# Altium PCB OmniCore_SDR.PcbDoc (part 14 of 14)
Units mil, origin at the board's own origin, x right, y up, seen from the top; angles counter-clockwise.
Board outline 4724.72 x 2755.91 mil, 8 copper layers (Top, GND 1, Layer 1, Layer 2, GND 2, Layer 3, Power, Bottom), stack 40.468 mil thick; 534 components, 427 nets, 2325 pads, 1892 vias.
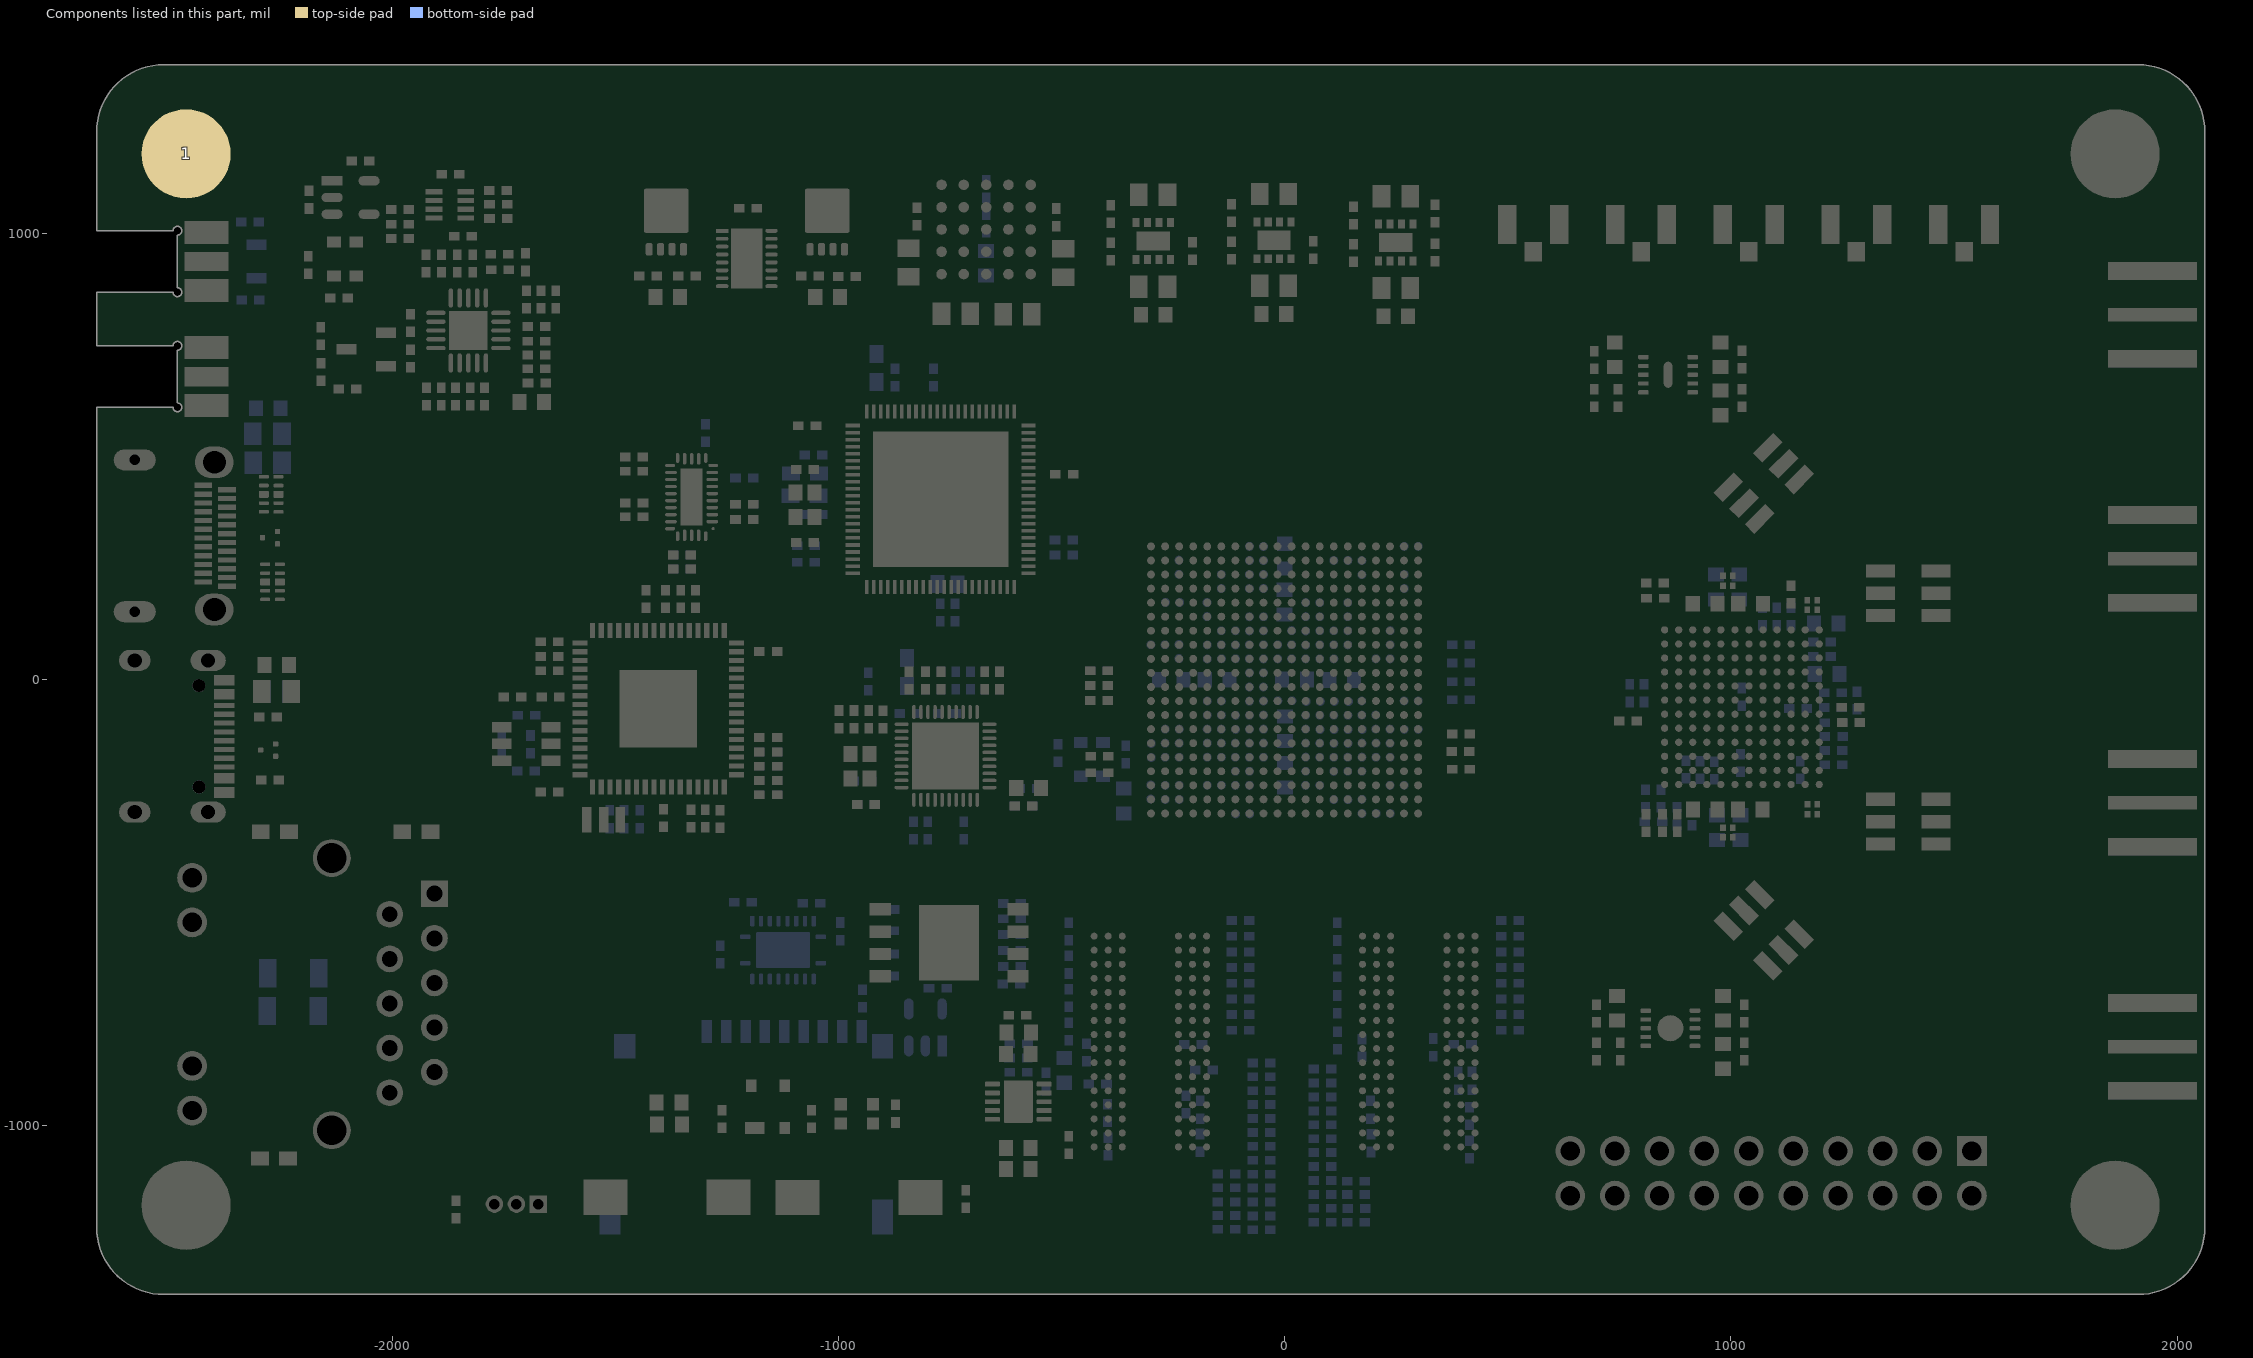
[diagram p19: the components of this part, seen from the top]

## Silkscreen, mask and mechanical layers (free items; w line width, h text height) (continued)
Mechanical 1:
  lines w5: -2662.2,1005.91 -2662.52,1005.91 ; -2662.52,1005.91 -2662.52,1227.95 -2662.2,1227.95 cw(c-2512.2,1227.95) -2512.2,1377.95 1912.2,1377.95 cw(c1912.2,1227.95) 2062.2,1227.95 2062.2,-1227.95 cw(c1912.2,-1227.95) 1912.2,-1377.95 -2512.2,-1377.95 cw(c-2512.2,-1227.95) -2662.2,-1227.95 ; -2662.52,1005.91 -2491.26,1005.91 cw(c-2481.42,1005.91) -2481.42,996.06 -2481.42,877.95 cw(c-2481.42,868.11) -2491.26,868.11 -2662.2,868.11 -2662.2,747.91 -2491.26,747.91 cw(c-2481.42,747.91) -2481.42,738.07 -2481.42,619.96 cw(c-2481.42,610.12) -2491.26,610.12 -2662.2,610.12 -2662.2,-1227.95 ; -2662.2,-1227.95 -2662.2,-1227.95

## Text inside footprints (layer, text, board x,y; h text height)
J3: Top Courtyard "PCB Cutout" at -2579.84,738.07 h20 r270
J6: Top Courtyard "PCB Cutout" at -2579.84,996.06 h20 r270